# Altium PCB DSP大板子.PcbDoc (part 5 of 9)
Units mil, origin at the board's own origin, x right, y up, seen from the top; angles counter-clockwise.
Board outline 7874.02 x 9055.12 mil, 4 copper layers (Top Layer, GND02, PWR03, Bottom Layer), stack 23.756 mil thick; 656 components, 360 nets, 1967 pads, 2623 vias.
Unrouted connection lines stored in the file: 70.
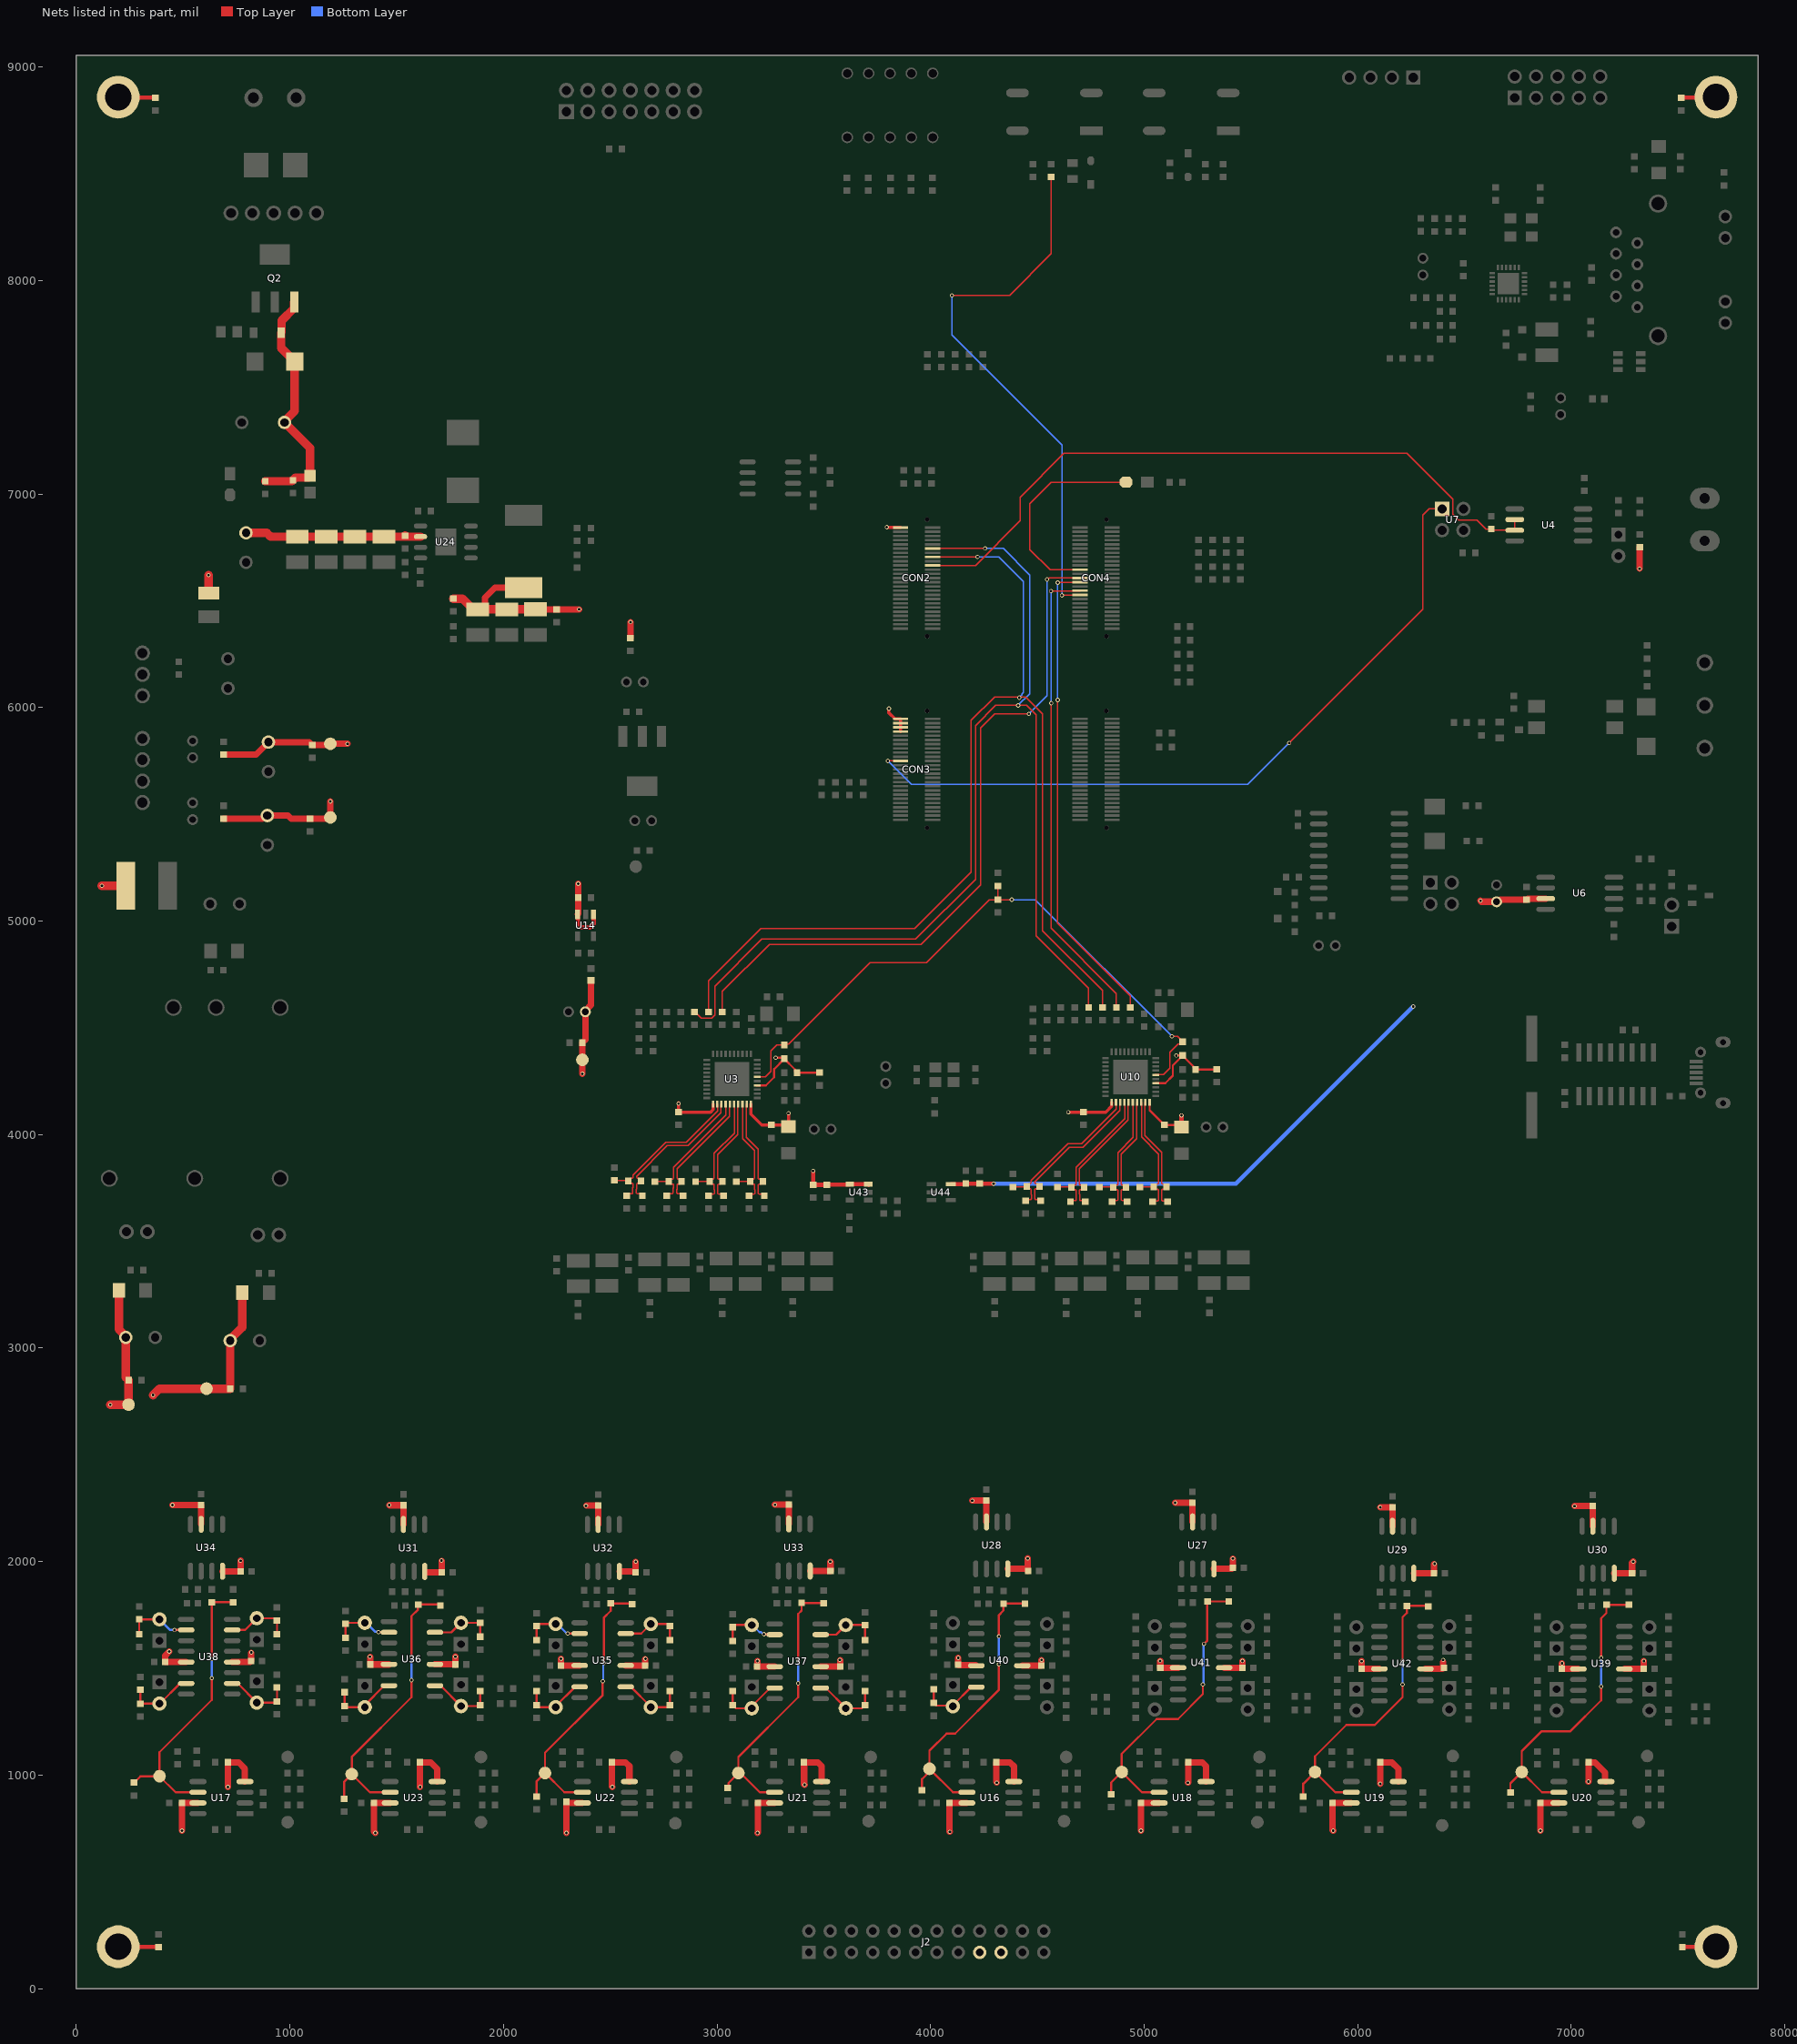
[diagram p4: the nets of this part, all layers, seen from the top]

## Part data (continued)
R18 R24 R26 R27 R28 R31 R63 R64 R66 R68: library part R_10, "贴片电阻", BOM名称=贴片电阻, 学习资源=www.ooocke.com, 版权归属=源创客
R88: library part R, "贴片电阻1%", BOM名称=贴片电阻, 封装库来自淘宝卖家 ID：黄晶宝石=其他店铺购入均为盗版，不享受售后技术支持服务，请立即申请退款, 版权归属="来自淘宝 ID：黄晶宝石", 联系售后=https://shop463601444.taobao.com
R274: library part rc0805fr-07100kl, "电阻类型:厚膜电阻;阻值:100kΩ;精度:±1%;功率:125mW;工作电压:150V;温度系数:±100ppm/℃;", JLCPCB Part Class="Extended Part", LCSC Part Name="厚膜电阻 100kΩ ±1% 125mW", Manufacturer=YAGEO(国巨), ManufacturerPart=RC0805FR-07100KL, Operating Temperature=-55℃~+155℃, Power(Watts)=125mW, Temperature Coefficient=±100ppm/℃, Tolerance=±1%, Voltage-Supply(Max)=150V, AddInBom=yes, ConvertToPcb=yes, Datasheet=https://item.szlcsc.com/datasheet/RC0805FR-07100KL/97550.html, FootprintName=R0805_NEW, ModelId=37a81e68749a4138bd2dfa6897b24b85, ModelName=R0805_L2.0-W1.3-H0.6, ModelTransform=78.74,51.181,0,0,0,0,0,-0.0005,0, Supplier=LCSC, Supplier Footprint=0805, SupplierPart=C96346, Symbol=RC0805FR-07100KL, Type=厚膜电阻
RJ1: "连接器类型:RJ45插座;安装方式:弯插;端口数量:2;LED:带LED;屏蔽:有屏蔽;触头镀层:金;工作温度:0℃~+70℃;", JLCPCB Part Class="Extended Part", LCSC Part Name="弯插 带LED", Manufacturer=belfuse, ManufacturerPart=SI-46001-F, Operating Temperature=0℃~+70℃, AddInBom=yes, Connector Type=RJ45插座, Contact Plating=金, ConvertToPcb=yes, Datasheet=https://item.szlcsc.com/datasheet/SI-46001-F/20524665.html, FootprintName=RJ45-TH_BELFUSE_SI-46001-F, LED=带LED, ModelId=7e7265f4ce6d4878958776467abf3fc9, ModelName=RJ45-TH_BELFUSE_SI-46001-F, ModelTransform=639.999,670.39236,0,0,0,0,0,-25.079,-157.48, Mounting Type=弯插, Number of Ports=2, PoE=不带PoE, Shielding=有屏蔽, Supplier=LCSC, Supplier Footprint=RJ45-TH, SupplierPart=C19267755, Symbol=SI-46001-F
SW1 SW2: library part "TSW SMD-6x6", "SW2", BOM名称=贴片6x6轻触开关, 唯一出售店铺网址=https://shop463601444.taobao.com, 版权归属="封装库来自淘宝 ID：黄晶宝石"
SW3: BOM_JLCPCB Part Class="Extended Part", BOM_Manufacturer=Dailywell, BOM_Manufacturer Part=2MS1T2B2VS2QES, BOM_Supplier=LCSC, BOM_Supplier Part=C545202, Contributor=LCSC, spicePre=S, spiceSymbolName=2MS1T2B2VS2QES
U1: "USB2UART"
U2: "输入类型:DC;正向压降(Vf):1.2V;输出电流:50mA;隔离电压(Vrms):5kV;直流反向耐压(Vr):6V;负载电压:80V;输出通道数:-;集射极饱和电压(VCE(sat)):200mV@20mA,1mA;", Current Transfer Ratio (CTR) Maximum/Saturation Value=600%, Current Transfer Ratio (CTR) Minimum=50%, Forward Current(If)=50mA, Isolation Voltage(Vrms)=5kV, JLCPCB Part Class="Extended Part", LCSC Part Name="DC输入 隔离电压(rms):5000V", Load Voltage=80V, Manufacturer=SHARP(夏普), ManufacturerPart=PC817X2CSP9F, Operating Temperature=-30℃~+100℃, Reverse Voltage=6V, Total Power Dissipation(Pd)=200mW, Voltage - Forward(Vf)=1.2V, AddInBom=yes, ConvertToPcb=yes, Datasheet=https://item.szlcsc.com/datasheet/PC817X2CSP9F/67489.html, Fall time=3us, FootprintName=SMD-4_L4.6-W6.5-P2.54-LS10.2-TL, Input type=DC, ModelId=991879f0d3e24dbd9895164815fb95aa, ModelName=SMD-4_L4.6-W6.5-H3.7-LS10.2-P2.54, ModelTransform=401.94494,181.102,0,0,0,0,0,0.003,0, Number of Outputs=-, Output Current=50mA, Output Type=光电三极管, Rise time=4us, Supplier=LCSC, Supplier Footprint=SMD-4P, SupplierPart=C66405, Symbol=PC817X2CSP9F, Vce Saturation(VCE(sat))=200mV@20mA,1mA
U3 U10: "分辨率:24;工作电压:3.3V~3.6V;接口类型:I2C；SPI;", JLCPCB Part Class="Extended Part", LCSC Part Name=四通道模数转换器(ADC), Manufacturer=ADI(亚德诺), ManufacturerPart=ADAU1979WBCPZ-RL, Operating Temperature=-40℃~+105℃, Voltage - Supply=3.3V~3.6V, AddInBom=yes, ConvertToPcb=yes, Datasheet=https://item.szlcsc.com/datasheet/ADAU1979WBCPZ-RL/209011.html, FootprintName=QFN-40_L6.0-W6.0-P0.50-TL-EP4.1, Interface Type=I2C；SPI, ModelId=7c9bc19ca4c64354924a13059f0c15c7, ModelName=QFN-40_L6.0-W6.0-P0.50-TL-EP4.1, ModelTransform=237.007,237.007,0,0,0,0,0,0,0, Number of Channels=4, Resolution=24, Supplier=LCSC, Supplier Footprint=LFCSP-40(6x6), SupplierPart=C207957, Symbol=ADAU1979WBCPZ-RL
U4: library part TJA1057GT3, CLASS=IC
U5: "接口类型:I2C;存储容量:64Kbit;时钟频率(fc):1MHz;", Clock Frequency=1MHz, JLCPCB Part Class="Extended Part", LCSC Part Name="64 Kbit串行I2C总线EEPROM", Manufacturer=ST(意法半导体), ManufacturerPart=M24C64-RMN6TP, Operating Temperature=-40℃~+85℃, Voltage - Supply=1.8V~5.5V, AddInBom=yes, ConvertToPcb=yes, Data Retention - TDR (Year)=200年, Datasheet=https://item.szlcsc.com/datasheet/M24C64-RMN6TP/81133.html, Features=内置上电复位(POR)；硬件写保护功能；内置错误纠正码(ECC)功能, FootprintName=SOIC-8_L5.0-W4.0-P1.27-LS6.0-BL, Interface=I2C, Memory Size=64Kbit, ModelId=7abc64c95a1a4a04a4ef38f9097c870b, ModelName=SOIC-8_L5.0-W4.0-P1.27-LS6.0-BL, ModelTransform=192.913,236.22,0,0,0,0,0,0,0, Supplier=LCSC, Supplier Footprint=SOIC-8, SupplierPart=C79988, Symbol=M24C64-RMN6TP, Write Cycle Endurance=400万次, Write Cycle Time(Tw)=5ms
U7 U11: "插针结构:2x2P;间距:2.54mm;行距:2.54mm;圆针/方针:方针;安装方式:直插;排数:双排;总PIN位数:4P;额定电流:3A;塑高:2.54mm;触头材质:黄铜;触头镀层:金;工作温度:-40℃~+105℃;颜色:黑色;", Color=黑色, Current Rating=3A, JLCPCB Part Class="Extended Part", LCSC Part Name="2x2P 间距:2.54mm 方针 直插", Manufacturer=GREENCONN(格康), ManufacturerPart=GPHA201-0202A001A1BA, Operating Temperature=-40℃~+105℃, AddInBom=yes, Circluar Pins/Square Pins=方针, Contact Material=黄铜, Contact Plating=金, ConvertToPcb=yes, Datasheet=https://item.szlcsc.com/datasheet/GPHA201-0202A001A1BA/8446427.html, FootprintName=HDR-TH_4P-P2.54-V-M-R2-C2-S2.54, Insulation Height=2.54mm, ModelId=396726ecc332483f84428c142640bc15, ModelName=HDR-TH_4P-P2.54-M-LI-2X2P, ModelTransform=200.03897,196.85,0,0,0,0,0,0,-118.11, Mounting Type=直插, Number of Pins=4P, Number of Rows=双排, Pin Structure=2x2P, Pitch=2.54mm, Row Spacing=2.54mm, Supplier=LCSC, Supplier Footprint=插件,P=2.54mm, SupplierPart=C7434503, Symbol=GPHA201-0202A001A1BA
U8: "插针结构:1x2P;间距:2.54mm;行距:-;圆针/方针:方针;安装方式:直插;排数:单排;总PIN位数:2P;额定电流:3A;额定电压:1kV;配合针长度:6mm;塑高:2.5mm;端接针长度:3mm;触头材质:黄铜;触头镀层:金;工作温度:-40℃~+105℃;颜色:黑色;", Color=黑色, Current Rating=3A, JLCPCB Part Class="Extended Part", LCSC Part Name="1x2P 间距:2.54mm 方针 直插", Manufacturer=hanxia(韩下), ManufacturerPart="HX PZ2.54-1x2P ZZ", Operating Temperature=-40℃~+105℃, Voltage Rating (Max)=1kV, AddInBom=yes, Circluar Pins/Square Pins=方针, Contact Material=黄铜, Contact Plating=金, ConvertToPcb=yes, Datasheet=https://item.szlcsc.com/datasheet/HX%2520PZ2.54-1x2P%2520ZZ/34444548.html, FootprintName=HDR-TH_2P-P2.54-V-M-3, Insulation Height=2.5mm, Length of End Connection Pin=3mm, Length of Mating Pin=6mm, ModelId=c7a9f3c3e6e34627af2bf939e464cb35, ModelName=HDR-TH_2P-P2.54-M-LI-1X2P, ModelTransform=200,100,0,0,0,0,0,0,-118.11, Mounting Type=直插, Number of Pins=2P, Number of Rows=单排, Pin Structure=1x2P, Pitch=2.54mm, Row Spacing=-, Supplementary Features=-, Supplier=LCSC, Supplier Footprint=插件,P=2.54mm, SupplierPart=C32713268, Symbol="HX PZ2.54-1X2P ZZ"
U9: "MCP2515是一款独立的CAN控制器，支持CAN V2.0B协议，数据传输速率为1 Mbps。它通过SPI接口与MCU通信。", Current - Supply=5mA, JLCPCB Part Class="Extended Part", LCSC Part Name=独立CAN控制器带SPI接口, Manufacturer=MICROCHIP(美国微芯), ManufacturerPart=MCP2515T-I/SO, Operating Temperature=-40℃~+85℃, Quiescent Supply Current=1uA, Voltage - Supply=2.7V~5.5V, AddInBom=yes, ConvertToPcb=yes, Data Rate=1Mbps, Datasheet=https://item.szlcsc.com/datasheet/MCP2515T-I%252FSO/165124.html, Features=可编程位时序；单次发送模式；低功耗模式, FootprintName=SOIC-18_L11.6-W7.5-P1.27-LS10.3-BL, ModelId=591e416e62784c3bb8a96e1097595c87, ModelName=SOIC-18_L11.6-W7.5-H2.7-LS10.3-P1.27, ModelTransform=456.692,409.68154,0,0,0,0,0,0,0, Protocol=SPI, Supplier=LCSC, Supplier Footprint=SOIC-18-300mil, SupplierPart=C153782, Symbol=MCP2515T-I/SO, Type=CAN控制器
U12: "类型:PHY收发器;端口数量:1;MAC接口:RMII;", JLCPCB Part Class="Extended Part", LCSC Part Name="KSZ8081RNA/RND 10BASE-T/100BASE-TX PHY 收发器", Manufacturer=MICROCHIP(美国微芯), ManufacturerPart=KSZ8081RNACA-TR, Operating Temperature=0℃~+70℃, Voltage - Supply=3.3V, AddInBom=yes, ConvertToPcb=yes, Data Rate=10Mbit/s；100Mbit/s, Datasheet=https://item.szlcsc.com/datasheet/KSZ8081RNACA-TR/101231.html, Ethernet Speed Standards=10BASE-T；100BASE-TX, Features=错误检测与恢复；低功耗模式；可编程LED指示；电缆诊断, FootprintName=QFN-24_L4.0-W4.0-P0.50-BL-EP2.6, MAC Interface=RMII, ModelId=1e6a51e223ba431598528b34e5bdfcc9, ModelName=QFN-24_L4.0-W4.0-H0.9-P0.50, ModelTransform=157.48,157.48,0,90,0,0,0,0,0, Number of Ports=1, Supplier=LCSC, Supplier Footprint=QFN-24-EP(4x4), SupplierPart=C100017, Symbol=KSZ8081RNACA-TR, Type=PHY收发器
U13: "插针结构:1x4P;间距:2.54mm;行距:2.54mm;圆针/方针:方针;安装方式:直插;排数:单排;总PIN位数:4P;额定电流:3A;塑高:2.54mm;触头材质:黄铜;触头镀层:金;工作温度:-40℃~+105℃;颜色:黑色;", Color=黑色, Current Rating=3A, JLCPCB Part Class="Extended Part", LCSC Part Name="1x4P 间距:2.54mm 方针 直插", Manufacturer=GREENCONN(格康), ManufacturerPart=GPHA101-0402A001A1BA, Operating Temperature=-40℃~+105℃, AddInBom=yes, Circluar Pins/Square Pins=方针, Contact Material=黄铜, Contact Plating=金, ConvertToPcb=yes, Datasheet=https://item.szlcsc.com/datasheet/GPHA101-0402A001A1BA/8446402.html, FootprintName=HDR-TH_4P-P2.54-V-M, Insulation Height=2.54mm, ModelId=112f4d05e8d64e99ab9a333894bea4f9, ModelName=HDR-TH_4P-P2.54-M-LI-1X4P, ModelTransform=399.999,104.7242,0,0,0,0,0,0,-118.11, Mounting Type=直插, Number of Pins=4P, Number of Rows=单排, Pin Structure=1x4P, Pitch=2.54mm, Row Spacing=2.54mm, Supplier=LCSC, Supplier Footprint=插件,P=2.54mm, SupplierPart=C7434478, Symbol=GPHA101-0402A001A1BA
U14: "输出极性:正极;工作电压:5.5V;输出电压:3.3V;输出电流:250mA;电源纹波抑制比(PSRR):82dB@(1kHz);输出类型:固定;", JLCPCB Part Class="Extended Part", LCSC Part Name="3.3V 250mA 5.5V", Manufacturer=TI(德州仪器), ManufacturerPart=LP5907MFX-3.3/NOPB, Operating Temperature=-40℃~+125℃@(Tj), Output Current=250mA, Output Voltage=3.3V, Power Supply Rejection Ratio (PSRR)=82dB@(1kHz), standby current=12uA, Voltage - Supply=5.5V, Voltage Dropout=250mV@(250mA), AddInBom=yes, ConvertToPcb=yes, Datasheet=https://www.ti.com/cn/lit/ds/symlink/lp5907.pdf, Features=热关断；使能控制；输出放电；短路保护；输入欠压保护, FootprintName=SOT-23-5_L3.0-W1.7-P0.95-LS2.8-BR, ModelId=0a2a1b8f50944f73965918ad6e5fe167, ModelName=SOT-23-5_L2.9-W1.6-H1.1-LS2.8-P0.95, ModelTransform=114.173,109.636,0,180,0,0,0,0,0, Noise=10uVrms, Number of Outputs=1, Output Configuration=正极, Output Type=固定, Supplier=LCSC, Supplier Footprint=SOT-23-5, SupplierPart=C80670, Symbol=LP5907MFX-3.3/NOPB
U15: Dropout Voltage=1.3V@(800mA), JLCPCB Part Class="Basic Part", LCSC Part Name="输出3.3V 1A", Manufacturer=AMS, Manufacturer Part=AMS1117-3.3, MAX Output Current=1A, Maximum Input Voltage=-, Output Voltage=3.3V, Power Supply Rejection Ratio (PSRR)=72dB@(120Hz), Add into BOM=yes, Convert to PCB=yes, Datasheet=https://atta.szlcsc.com/upload/public/pdf/source/20180727/C6186_7A095716F0823C02F1997A905E26C086.pdf, Device=AMS1117-3.3_C6186, Feature=-, Noise=-, Number of Outputs=1, Operating Temperature=-, Output Polarity=正极, Output Type=固定, standby current=-, Supplier=LCSC, Supplier Footprint=SOT-223-3, Supplier Part=C6186, Symbol=AMS1117-3.3
U16 U17 U18 U19 U20 U21 U22 U23: library part AD620BR, "CI-AD620BR"
U24: "功能类型:降压型;工作电压:4.5V~60V;输出电压:800mV~58.8V;输出电流:5A;输出类型:可调;", Frequency - Switching=500kHz, JLCPCB Part Class="Extended Part", LCSC Part Name="降压型 5A 4.5V~60V", Manufacturer=TI(德州仪器), ManufacturerPart=TPS54560BDDAR, Operating Temperature=-40℃~+150℃@(TJ), Output Current=5A, Output Voltage=800mV~58.8V, Quiescent Current=146uA, Voltage - Supply=4.5V~60V, AddInBom=yes, ConvertToPcb=yes, Datasheet=https://www.ti.com/cn/lit/gpn/tps54560b, Features=轻载高效模式；逐波限流；频率同步；过流保护, FootprintName=POWERPAD-SO-8_L4.9-W3.9-P1.27-LS6.0-BL-EP, Function=降压型, ModelId=3be500d54979453db96888fa439d0a60, ModelName=POWERPAD-SO-8_L4.9-W3.9-P1.27-LS6.0-BL-EP, ModelTransform=192.913,236.22,0,0,0,0,0,0,0, Number of Outputs=1, Output Type=可调, Supplier=LCSC, Supplier Footprint=SO-8, SupplierPart=C1850354, Switch tube (built-in/external)=内置, Symbol=TPS54560BDDAR, Synchronous Rectifier=否, Topology=降压式
U25: library part ura2412s-6wr3_c2757452, "特性：超宽4:1输入电压范围。 高效率达85%。 空载功耗低至0.24W。 I/O隔离测试电压1.5kV DC。 输入欠压保护，输出短路、过流保护。 工作环境温度范围：-40℃至+85℃。应用：医疗保健。 工业控制", Capacitive Load(Max)=120uF, Isolation Voltage(Vrms)=1.5kV, JLCPCB Part Class="Extended Part", LCSC Part Name="9V~36V ±12V 250mA 6W", Manufacturer=MORNSUN(金升阳), Operating Temperature=-40℃~+85℃, Output Current(Max)=250mA, Output Power=6W, Output Voltage=±12V, Quiescent Supply Current=-, Voltage - Supply=9V~36V, AddInBom=yes, Conversion Efficiency=83%, ConvertToPcb=yes, Datasheet=https://item.szlcsc.com/datasheet/URA2412S-6WR3/2873721.html, Features=欠压保护；短路保护；过流保护；轻载高效模式, FootprintName=PWRM-TH_URAXXXXS-6WR3, Height=12mm, Length=22mm, ManufacturerPart=URA2412S-6WR3, ModelId=59ee18447e164eb5803ce5c0826121e9, ModelName=PWRM-TH_URAXXXXS-6WR3, ModelTransform=866.14,374.015,0,0,0,0,0,-81.299,-161.417, Number of Outputs=2, Ripple Noise=120mVp-p, Supplier=LCSC, Supplier Footprint=SIP,22x9.5mm, SupplierPart=C2757452, Symbol=URA2412S-6WR3_C2757452, Type=-, Voltage Regulation=-, Width=9.5mm
U26: "特性：超宽4:1输入电压范围。高效率达90%。空载功耗低至0.24W。I/O隔离测试电压1.5kV DC。输入欠压保护、输出短路、过流、过压保护。工作环境温度范围：-40℃至+105℃。应用：工业控制。电力", JLCPCB Part Class="Extended Part", LCSC Part Name="15W 隔离式 DC-DC 转换器", Manufacturer=MORNSUN(金升阳), ManufacturerPart=URA2415YMD-15WR3, AddInBom=yes, ConvertToPcb=yes, Datasheet=https://item.szlcsc.com/datasheet/URA2415YMD-15WR3/5842586.html, FootprintName=PWRM-TH_URA2415YMD-15WR3, Supplier=LCSC, Supplier Footprint=DIP,25.4x25.4mm, SupplierPart=C5182197, Symbol=URA2415YMD-15WR3_C5182197
U27 U28 U29 U30 U31 U32 U33 U34: "LT1793CS8#PBF", AddInBom=yes, DesignItemID=LT1793, Device=LT1793, FootprintName=SOP-8, LibraryName="1.6 - ADI系列精密运放", OriginModelName="User Library-so-8", SymbolName=LT1793
  U27: UniqueId=b94fd32bcc95872d
  U28: UniqueId=2c27b242a2875aaf
  U29: UniqueId=be87043ebfc5f98d
  U30: UniqueId=03a1f9b1f2129ca8
  U31: UniqueId=4ec783ed4741de1f
  U32: UniqueId=484e3008dca2bfa8
  U33: UniqueId=2dbbb3175ebf36d7
  U34: UniqueId=124c013cfc851acc
U35 U36 U37 U38 U39 U40 U41 U42: library part DG201BDY-T1E3, AddInBom=yes, DesignItemID=DG201BDY-T1E3, Device=DG201BDY-T1E3, FootprintName=dg201BDY, LibraryName="4.1 - 未分类器件", SymbolName=DG201BDY-T1E3
  U35: UniqueId=6151f2f354ad58a1
  U36: UniqueId=ea6c5e45b64ed132
  U37: UniqueId=6e245fde712204fc
  U38: UniqueId=4bb3335060f18692
  U39: UniqueId=ca4d2b64b6ec8380
  U40: UniqueId=1bdc0ab44f99f92d
  U41: UniqueId=c69de7c088414df5
  U42: UniqueId=28995c53ef78d865
U43: "输出类型:固定;工作电压:3.02V~5.5V;输出电压:3V;输出电流:20mA;精度:±0.05%;", JLCPCB Part Class="Extended Part", LCSC Part Name="3.02V~5.5V 串联 460uA 8ppm/℃", Manufacturer=TI(德州仪器), ManufacturerPart=REF2030AIDDCR, Minimum Cathode Current for Regulation=-, Operating Temperature=-40℃~+125℃, Output Current=20mA, Output Voltage=3V, Quiescent Current=460uA, Temperature Coefficient=8ppm/℃, Tolerance=±0.05%, Voltage - Supply=3.02V~5.5V, AddInBom=yes, ConvertToPcb=yes, Datasheet=https://www.ti.com/cn/lit/ds/symlink/ref2030.pdf, Features=使能/关断；内置输出缓冲；多路参考输出, FootprintName=SOT-23-5_L2.9-W1.6-P0.95-LS2.8-BL, ModelId=018c57e721114987ae90467fe9f1d259, ModelName=SOT-23-5_L2.9-W1.6-P0.95-LS2.8-BL, ModelTransform=114.96,110.236,0,0,0,0,0,0,0, Noise - 1/10Hz to 10Hz=12ppmp-p, Noise - 10Hz to 10kHz=-, Output Type=固定, Reference Type=串联, Supplier=LCSC, Supplier Footprint=SOT-23-5, SupplierPart=C528704, Symbol=REF2030AIDDCR
U44: "放大器数:单路;增益带宽积(GBP):10MHz;输入偏置电流(Ib):5pA;输入失调电压(Vos):5uV;压摆率(SR):20V/us;轨到轨:轨到轨输入,轨到轨输出;", Ib - Input Bias Current=5pA, Input Offset Current(Ios)=2pA, Input Offset Voltage Drift(Vos TC)=200nV/℃, JLCPCB Part Class="Extended Part", LCSC Part Name=36V低失调电压、低输入偏置电流、轨到轨输入/输出精密运算放大器，具有e-trim特性, Manufacturer=TI(德州仪器), ManufacturerPart=OPA192IDBVR, Maximum Power Supply Range (Vdd-Vss)=36V, Operating Temperature=-40℃~+125℃, Output Current=65mA, Quiescent Current(Iq)=1mA, Vos - Input Offset Voltage=5uV, AddInBom=yes, Common Mode Rejection Ratio(CMRR)=140dB, ConvertToPcb=yes, Datasheet=https://www.ti.com/cn/lit/gpn/opa192, Dual Supply=-18V~-2.25V；2.25V~18V, FootprintName=SOT-23-5_L3.0-W1.7-P0.95-LS2.8-BL, Gain Bandwidth Product=10MHz, ModelId=0a2a1b8f50944f73965918ad6e5fe167, ModelName=SOT-23-5_L2.9-W1.6-H1.1-LS2.8-P0.95, ModelTransform=118.60433,114.173,0,90,0,0,0.0005,0.0005,0, Noise density(eN)=5.5nV/√Hz@1kHz, Number of Channels=单路, Rail to Rail=轨到轨输入,轨到轨输出, Single Supply=4.5V~36V, Slew Rate=20V/us, Supplier=LCSC, Supplier Footprint=SOT-23-5, SupplierPart=C139648, Symbol=OPA192IDBVR
USB1: Current Rating - Power (Max)=1A, JLCPCB Part Class="Extended Part", LCSC Part Name="Micro-B 母 卧贴", Manufacturer="SHOU HAN(首韩)", Operating Temperature Range=-20℃~+85℃, Add into BOM=yes, Connector Type=Micro-B, Convert to PCB=yes, Datasheet=https://atta.szlcsc.com/upload/public/pdf/source/20220415/2494EDFF499AF6F852F7C820374B6AF3.pdf, Device=MicroXNJ, Gender=母, Manufacturer Part=MicroXNJ, Mounting Style=卧贴, Number of Contacts=5P, Number of Ports=1, Standard="USB 2.0", Supplier=LCSC, Supplier Footprint=SMD, Supplier Part=C404969, Symbol=MICROXNJ
X1: library part 12MHz, BOM_JLCPCB Part Class="Extended Part", BOM_Manufacturer="Yangxing Tech", BOM_Manufacturer Part=X49SM12MSB2SC, BOM_Supplier=LCSC, BOM_Supplier Part=C110563, Contributor=LCSC, nameAlias=Frequency, spicePre=X, spiceSymbolName=X49SM12MSB2SC
X2: "晶振类型:贴片晶振;频率:16MHz;常温频差:±10ppm;负载电容:20pF;频率稳定度:±20ppm;", Equivalent Series Resistance(ESR)=80Ω, Frequency Stability=±20ppm, JLCPCB Part Class="Extended Part", LCSC Part Name="YSX530GA 16MHZ 2P 5032 20PF ±10PPM -40~85℃ (±20PPM)", Load Capacitance=20pF, Manufacturer=YXC(扬兴晶振), ManufacturerPart=X503216MSB2GI, Normal temperature Frequency Tolerance=±10ppm, Operating Temperature=-40℃~+85℃, AddInBom=yes, ConvertToPcb=yes, Datasheet=https://item.szlcsc.com/datasheet/X503216MSB2GI/113805.html, FootprintName=OSC-SMD_L5.0-W3.2, ModelId=36c8b961b9064b60a7c920ab5154e867, ModelName=OSC-SMD_L5.0-W3.2-H1.4, ModelTransform=196.85,126.023,0,0,0,0,0,0,0, Supplier=LCSC, Supplier Footprint=SMD5032-2P, SupplierPart=C112572, Symbol=X503216MSB2GI, Type=贴片晶振
Y1: library part CRYSTAL_4P, CLASS=IC
Z1 Z2: library part "DIODE BI-DIR TRIG"
U6: CLASS=IC

## Free pads (board coordinates)
  round 200 hole 125: 1(196.85,196.85) 2(7677.17,196.85) 3(7677.17,8858.27) 4(196.85,8858.27)

## Via types
v1: diameter 20, hole 12, Top Layer to Bottom Layer, tented both sides, 2623 vias

## Nets (pads, with @x,y where several pads share a name; then routed paths per layer and width w, separated by ;. In a path a pad name is that pad's centre, name@x,y a point inside that pad or via, vN(x,y) a via of type N, cw(c..) or ccw(c..) an arc to the next point about the centre after c; other vN are vias at no path point)
1: pad.1 R300.1 | length 188.9
  Top Layer w20: pad.1@196.85,196.85 197.74,195.96 384.11,195.96 R300.1@385,195.08
2: pad.2 R301.1 | length 157.9
  Top Layer w20: R301.1@7520,195.08 7520.89,195.96 7676.28,195.96 pad.2@7677.17,196.85
3: pad.3 R302.1 | length 163.6
  Top Layer w20: R302.1@7515,8854.92 7516.67,8856.59 7675.49,8856.59 pad.3@7677.17,8858.27
4: pad.4 R303.1 | length 174.5
  Top Layer w20: pad.4@196.85,8858.27 198.52,8856.59 368.33,8856.59 R303.1@370,8854.92
485DE: CON2.31 R51.2 U4.2 U4.3 | length 3247.8
  Top Layer w6: CON2.31@4009.44,6665.46 4009.91,6665 4210,6665 4420,6875 4420,6985 4625,7190 6230,7190 6445,6975 6445,6905 6472.49,6877.51 6557.49,6877.51 6599.92,6835.08 R51.2@6625,6835.08 6630.08,6830 U4.3@6735,6830 U4.2@6735,6880
+5V_SYS: C22.1 C27.1 C78.2 C109.2 C110.2 C111.2 C114.1 C115.1 C116.1 CON2.50 CON3.44 CON3.46 CON3.48 CON3.50 L3.2 R34.2 R126.1 R131.2 U6.3 U14.1 U14.3 U44.5 | length 4416.9
  Top Layer w15: v1(3795,6845) 3797.44,6842.56 CON2.50@3859.84,6842.56 ; v1(3805,5995) 3805,5974.99 3833.49,5946.5 CON3.50@3859.84,5946.5 CON3.48@3859.84,5926.8 CON3.46@3859.84,5907.2 CON3.44@3859.84,5887.5
  Top Layer w20: U14.3@2347.6,5031.2 2349.4,5029.4 2349.4,4985.6 2365,4970 2405,4970 2422.4,4987.4 U14.1@2422.4,5031.2 ; U44.5@4095.42,3767.4 C111.2@4162.6,3767.4 ; C111.2@4165,3770.08 C109.2@4230,3770.08 4294.92,3770.08 v1(4295,3770)
  Top Layer w30: C114.1@1880,6459.5 1897.04,6459.5 1914.24,6476.7 1914.24,6514.24 1960.71,6560.71 L3.2@2095,6560.71 ; C116.1@2149.85,6459.85 C116.1@2150,6460 C110.2@2250,6460 v1(2355,6460) ; U14.3@2347.6,5031.2 2350.04,5033.64 2350.04,5109.96 C78.2@2350.08,5110 2350.08,5174.92 v1(2350,5175) ; R126.1@2595,6325 v1(2595,6400) ; v1(6575,5095) 6579.41,5090.59 6649.41,5090.59 C22.1@6650,5090 6655.73,5090 6665.73,5100 C27.1@6790,5100 ; C27.1@6790.71,5100 6795.71,5105 U6.3@6880,5105 ; v1(7320,6650) R34.2@7320,6750.16
  Top Layer w40: R131.2@1765,6509.84 1808.71,6509.84 1859.05,6459.5 C114.1@1880,6459.5 1880.1,6459.6 2014.9,6459.6 C115.1@2015,6459.7 2015.15,6459.85 C116.1@2149.85,6459.85
  Bottom Layer w20: v1(4295,3770) 5430,3770 v1(6260,4600)
+12V: +12.1 C142.1 C143.1 C158.2 C160.2 C162.2 C164.2 C166.2 C168.2 C170.2 C173.2 C181.2 C183.2 C185.2 C187.2 C189.2 C191.2 C193.2 C195.2 R195.1 U27.7 U28.7 U29.7 U30.7 U31.7 U32.7 U33.7 U34.7 U35.13 U36.13 U37.13 U38.13 U39.13 U40.13 U41.13 U42.13 | length 2929.5
  Top Layer w10: v1(1375.23,1555) v1@1376.23,1554 ; U36.13@1463.8,1518.63 U36.13@1464.23,1519.07 U36.13@1465.16,1520 ; v1(1465,2265) v1@1465.93,2264.07 ; v1(2270,1545) v1(2270,1545) ; v1(2386.43,2261.43) v1@2387.87,2262.87 ; C187.2@3187.9,1508.17 C187.2@3190,1510.27 ; v1@3270,2265 v1(3271.41,2266.41) ; C189.2@4129.76,1517.85 C189.2@4131.61,1516 ; v1(4129.76,1549.76) v1@4130,1550 ; v1@4195,2285 v1(4195.49,2285.49) ; U40.13@4211.03,1516 U40.13@4214.18,1512.85 ; v1(5075,1535) v1@5075.67,1534.33 ; v1@5145,2275 v1(5145.49,2275.49)
  Top Layer w30: v1(435.48,1579.31) 435.48,1578.85 415.6,1558.97 C183.2@415.6,1530 U38.13@515,1530 ; v1(450,2265) 450.52,2264.48 C173.2@585,2264.48 U34.7@585,2175.08 ; R195.1@690,5780.08 842.28,5780.08 C142.1@900,5837.8 1091.41,5837.8 1104.29,5824.92 C143.1@1105,5824.92 1105.04,5824.96 1184.96,5824.96 +12.1@1190,5830 v1(1270,5830) ; v1@1376.23,1554 C185.2@1376.23,1518.63 U36.13@1463.8,1518.63 ; v1@1465.93,2264.07 C166.2@1531.93,2264.07 U31.7@1531.93,2174.07 ; v1(2270,1545) C181.2@2269.95,1513.53 U35.13@2357.25,1513.53 ; v1@2387.87,2262.87 C168.2@2443.44,2262.87 U32.7@2443.44,2174.07 ; C187.2@3187.9,1508.17 U37.13@3270.2,1508.17 ; C187.2@3190,1510.27 v1(3190,1535) ; v1(3271.41,2266.41) C170.2@3336.39,2266.41 U33.7@3336.39,2176.41 ; C189.2@4129.76,1517.85 v1(4129.76,1549.76) ; C189.2@4131.61,1516 U40.13@4211.03,1516 ; v1(4195.49,2285.49) C160.2@4261.62,2285.49 U28.7@4261.62,2186.09 ; v1@5075.67,1534.33 C195.2@5075.67,1502.85 U41.13@5158.85,1502.85 ; v1(5145.49,2275.49) C158.2@5226.48,2275.49 U27.7@5226.48,2186.09 ; v1(6018.53,1533.53) C193.2@6018.53,1497.7 U42.13@6101.61,1497.7 ; v1(6105,2255) C162.2@6162.82,2255.02 U29.7@6162.82,2165.62 ; v1(6956.2,1523.8) C191.2@6956.2,1497.62 U39.13@7032.98,1497.62 ; v1(7015,2260) C164.2@7100.61,2260.02 U30.7@7100.61,2165.62
+15V: +15.1 C92.1 C96.1 C97.1 C98.1 C99.1 C100.1 C101.1 C107.1 C120.1 C154.2 J2.17 L7.2 U16.7 U17.7 U18.7 U19.7 U20.7 U21.7 U22.7 U23.7 | length 2364.5
  Top Layer w30: v1(495,740) 494.92,740.08 C96.1@494.92,870 U17.7@570,870 ; v1(1400,730) 1394.92,735.08 C107.1@1394.92,870 U23.7@1470,870 ; C100.1@2294.18,875 2294.18,730.82 v1(2295,730) ; C100.1@2298.48,870 U22.7@2370,870 ; v1(3190,730) 3191.32,731.32 C101.1@3191.32,870 U21.7@3270,870 ; v1(4090,735) 4088.45,736.55 C92.1@4088.45,870 U16.7@4170,870 ; v1(4985,740) 4985.58,740.58 C97.1@4985.58,870 U18.7@5070,870 ; v1(5885,740) 5882.71,742.29 C98.1@5882.71,870 U19.7@5970,870 ; v1(6855,740) 6854.84,740.16 C99.1@6854.84,870 U20.7@6941.91,870
  Top Layer w40: v1(160,2735) +15.1@245,2735 245.08,2735.08 C154.2@245.08,2850 ; L7.2@199.6,3270 199.6,3088.83 232.2,3056.23 C120.1@232.2,3050 232.2,2862.8 C154.2@245.04,2849.96
+24V_SYS: C102.1 C103.1 C104.1 C105.1 C106.1 C178.1 C179.2 C180.1 D7.1 D8.1 L4.1 L6.1 Q2.3 R127.2 R273.1 U24.2 | length 2184
  Top Layer w40: v1(120,5165) L6.1@231.57,5165 ; L4.1@620,6535.12 v1(620,6620) ; C102.1@795,6817.8 892.49,6817.8 910.59,6799.7 C103.1@1035,6799.7 C104.1@1170,6799.7 C105.1@1305,6799.7 C106.1@1440,6799.7 1534.78,6799.7 R127.2@1540,6804.92 1544.92,6800 U24.2@1611.89,6800 ; R273.1@885,7059.84 1009.92,7059.84 1026.69,7076.61 1088.43,7076.61 C179.2@1095,7083.19 ; Q2.3@1020.55,7898.39 1020.55,7870.48 961.46,7811.39 961.46,7757.09 D7.1@959.37,7755 959.37,7683.57 999.78,7643.16 1002.64,7643.16 1022.94,7622.85 D8.1@1022.94,7620 1022.94,7389.16 975,7341.22 C178.1@975,7335 1095,7215 C179.2@1095,7083.19 ; C179.2@1095,7084.37 C179.2@1095,7083.19
-12V: -12.1 C144.2 C145.1 C159.2 C161.2 C163.2 C165.2 C167.2 C169.2 C171.2 C174.2 C182.2 C184.2 C186.2 C188.2 C190.2 C192.2 C194.2 C196.2 R200.1 U27.4 U28.4 U29.4 U30.4 U31.4 U32.4 U33.4 U34.4 U35.4 U36.4 U37.4 U38.4 U39.4 U40.4 U41.4 U42.4 | length 2694.2
  Top Layer w10: v1(769.4,2004.4) v1@770,2005 ; C184.2@813.8,1530 C184.2@818.8,1535 ; v1@818.8,1573.8 v1(820,1575) ; U31.4@1631.93,1954.07 1631.93,1952.07 U31.4@1634.93,1949.07 ; v1(1710,2005) v1@1711.33,2003.67 ; C186.2@1774.59,1519.07 C186.2@1775.03,1518.63 ; C169.2@2612.84,1954.07 C169.2@2617.84,1949.07 ; v1@2617.84,1997.84 v1(2620,2000) ; v1@2663.75,1543.75 v1(2665,1545) ; v1(3530,2000) v1@3531.39,1998.61 ; v1(3575,1540) v1@3577.3,1537.7 ; C161.2@4446.02,1966.09 C161.2@4456.02,1956.09 C161.2@4455,1957.11 ; v1@4519.16,1539.16 v1(4520,1540) ; C159.2@5410.88,1966.09 C159.2@5415.88,1971.09 ; v1(5415,2015) v1@5415.88,2014.12 ; v1@5459.47,1534.47 v1(5460,1535) ; v1@6357.22,1987.22 v1(6360,1990) ; C194.2@6397.93,1497.7 C194.2@6402.93,1502.7 C194.2@6400,1505.62 ; v1@7339.4,1534.4 v1(7340,1535)
  Top Layer w30: U34.4@685,1955.08 C174.2@769.4,1955.08 v1(769.4,2004.4) ; R200.1@690,5480.16 872.33,5480.16 886.07,5493.9 C144.2@895,5493.9 992.06,5493.9 1006.12,5479.84 C145.1@1095,5479.84 1095.04,5479.88 1184.88,5479.88 -12.1@1190,5485 v1(1190,5560) ; U38.4@730.4,1530 C184.2@813.8,1530 ; C184.2@818.8,1535 v1@818.8,1573.8 ; U31.4@1634.93,1949.07 C167.2@1711.33,1949.07 v1@1711.33,2003.67 ; U36.4@1679.63,1519.07 C186.2@1774.59,1519.07 ; C186.2@1775,1518.66 v1(1775,1555) ; U32.4@2543.44,1954.07 C169.2@2612.84,1954.07 ; U35.4@2572.65,1513.53 C182.2@2663.75,1513.53 v1@2663.75,1543.75 ; C169.2@2617.84,1949.07 v1@2617.84,1997.84 ; U33.4@3436.39,1956.41 C171.2@3531.39,1956.41 v1@3531.39,1998.61 ; U37.4@3485.6,1508.17 C188.2@3577.3,1508.17 v1@3577.3,1537.7 ; U28.4@4361.62,1966.09 C161.2@4446.02,1966.09 ; U40.4@4429.58,1512.85 C190.2@4519.16,1512.85 v1@4519.16,1539.16 ; C161.2@4455,1957.11 v1(4455,2015) ; U27.4@5326.48,1966.09 C159.2@5410.88,1966.09 ; U41.4@5374.25,1502.85 C196.2@5459.47,1502.85 v1@5459.47,1534.47 ; C159.2@5415.88,1971.09 v1@5415.88,2014.12 ; U29.4@6262.82,1945.62 C163.2@6357.22,1945.62 v1@6357.22,1987.22 ; U42.4@6317.01,1497.7 C194.2@6397.93,1497.7 ; C194.2@6400,1505.62 6400,1530 ; U30.4@7200.61,1945.62 C165.2@7284.41,1945.62 7284.41,1994.41 v1(7290,2000) ; U39.4@7248.38,1497.62 C192.2@7339.4,1497.62 v1@7339.4,1534.4
  other v1: 6400,1540
-15V: -15.1 C113.2 C119.1 C121.2 C124.2 C126.2 C129.2 C131.2 C133.2 C135.2 C137.2 J2.19 L5.2 U16.4 U17.4 U18.4 U19.4 U20.4 U21.4 U22.4 U23.4 | length 3042.2
  Top Layer w10: U23.4@1668,970 U23.4@1690,970 ; U22.4@2568,970 U22.4@2590,970 ; U21.4@3468,970 U21.4@3490,970 ; U16.4@4368,970 U16.4@4390,970 ; U18.4@5268,970 U18.4@5290,970
  Top Layer w30: C126.2@709.92,1060 709.92,945.08 v1(710,945) ; C126.2@709.96,1059.25 760.75,1059.25 790,1030 U17.4@790,970 ; v1(1610,945) 1609.22,945.78 C137.2@1609.22,1060 1660,1060 1690,1030 U23.4@1690,970 ; v1(2510,945) 2508.52,946.48 C135.2@2508.52,1060 2572.43,1060 2590,1042.43 U22.4@2590,970 ; v1(3410,955) 3407.81,957.19 C133.2@3407.81,1060 3472.43,1060 3490,1042.43 U21.4@3490,970 ; v1(4310,965) 4307.11,967.89 C121.2@4307.11,1060 4372.43,1060 4390,1042.43 U16.4@4390,970 ; v1(5205,965) 5206.41,966.41 C124.2@5206.41,1060 5272.43,1060 5290,1042.43 U18.4@5290,970 ; v1(6105,960) 6105.7,960.7 C129.2@6105.7,1060 6160,1060 6190,1030 U19.4@6190,970 ; v1(7080,970) 7080.53,970.53 7080.53,1059.29 7080.57,1059.25 7110.75,1059.25 7157.57,1012.43 7157.57,973 7160.57,970 U20.4@7161.91,970
  Top Layer w40: v1(360,2780) 390,2810 -15.1@610,2810 C119.1@720.08,2810 721.1,2811.03 C113.2@721.1,3035 721.1,3041.23 777.3,3097.42 L5.2@777.3,3260
A1: CON2.39 R24.2 R63.2 | length 5350.6
  Top Layer w6: R24.2@2895,4574.84 2895.79,4574.84 2925.63,4545 2975,4545 2990.26,4560.26 2990.26,4695.26 3210,4915 3930,4915 4210,5195 4210,5915 4305,6010 v1(4410,6010) 4450,6010 4495,5965 4495,4930 4740,4685 R63.2@4740,4595 ; CON2.39@4009.44,6744.16 4009.86,6744.58 4254.58,6744.58 v1(4255,6745)
  Bottom Layer w6: v1(4255,6745) 4340,6745 4465,6620 4465,6065 v1(4410,6010)
ADC_PD_RST_N: R47.1 R82.1 R108.2 R113.2 U3.6 U10.6 | length 2974.4
  Top Layer w6: U3.6@3185,4270 3185.1,4269.9 3226.77,4269.9 3252.91,4296.04 3252.91,4392.91 3280,4420 R47.1@3315.08,4420 3319.12,4424.04 3335.52,4424.04 3716.48,4805 3980,4805 4275,5100 R108.2@4315,5100 ; R108.2@4315,5099.76 R113.2@4315,5165 ; R108.2@4315.24,5100 v1(4380,5100) ; U10.6@5050,4280 5050.5,4280.5 5089.77,4280.5 5120.41,4311.14 5120.41,4385.41 5159.63,4424.63 5169.71,4424.63 R82.1@5180.08,4435 5180.08,4435.79 5155.87,4460 v1(5130,4460)
  Bottom Layer w6: v1(4380,5100) 4490,5100 v1(5130,4460)
ADIN1: 10.1 R264.1 R270.2 R281.2 U17.6 | length 1360.2
  Top Layer w10: R281.2@270,965 270.87,965 300.87,995 10.1@390,995 ; U17.6@570,920 465,920 10.1@390,995 ; v1(635,1455) 635,1352.78 390,1107.78 10.1@390,995 ; v1(635,1545) 635,1810.12 R264.1@635,1810.16 R270.2@735,1810.16
  Bottom Layer w10: v1(635,1455) v1(635,1545)
ADIN2: 16.1 R260.1 R267.2 R278.2 U23.6 | length 1372.7
  Top Layer w10: R278.2@1255,895 1255,970 16.1@1290,1005 ; U23.6@1470,920 1375,920 16.1@1290,1005 ; v1(1570,1445) 1570,1365 1290,1085 16.1@1290,1005 ; v1(1570,1550) 1570,1745 1599.96,1774.96 1599.96,1797.1 R260.1@1601.93,1799.07 1701.01,1799.07 R267.2@1705,1795.08
  Bottom Layer w10: v1(1570,1445) v1@1570,1555
ADIN3: 14.1 R261.1 R268.2 R279.2 U22.6 | length 1362.7
  Top Layer w10: R279.2@2155,900 2155,970 14.1@2195,1010 ; U22.6@2370,920 2285,920 14.1@2195,1010 ; v1(2465,1440) 2465,1375.3 2195,1105.3 14.1@2195,1010 ; v1(2470,1525) 2470,1737.27 2502.65,1769.92 2502.65,1804.14 2599.96,1804.14 R268.2@2603.49,1800.62
  Bottom Layer w10: v1(2465,1440) 2467.5,1442.5 2467.5,1522.5 v1(2470,1525)
ADIN4: 15.1 R262.1 R269.2 R280.2 U21.6 | length 1322.4
  Top Layer w10: R280.2@3050,939.84 3053.95,943.79 3053.95,963.95 15.1@3100,1010 ; U21.6@3270,920 3200,920 3110,1010 15.1@3100,1010 ; v1(3380,1430) 3380,1365.28 3100,1085.28 15.1@3100,1010 ; v1(3380,1535) 3380,1755 3396.39,1771.39 R262.1@3396.39,1806.48 ; R262.1@3395.6,1806.48 3498.59,1806.48 R269.2@3500,1805.08
  Bottom Layer w10: v1(3380,1430) v1(3380,1535)
ADIN5: 9.1 R252.1 R263.2 R275.2 U16.6 | length 1376.1
  Top Layer w10: R275.2@3960,929.84 3960,981.73 3995,1016.73 9.1@3995,1030 ; U16.6@4170,920 4105,920 9.1@3995,1030 ; v1(4320,1520) 4320,1400 4115,1195 4075,1195 3995,1115 9.1@3995,1030 ; v1(4320,1650) 4320,1750 4341.08,1771.08 4341.08,1803.31 R263.2@4441.87,1803.31
  Bottom Layer w10: v1(4320,1520) v1(4320,1650)
ADIN6: 11.1 R249.1 R257.2 R258.2 U18.6 | length 1463.7
  Top Layer w10: R257.2@4845,910 4845,965 11.1@4895,1015 ; U18.6@5070,920 4990,920 11.1@4895,1015 ; v1(5275,1425) 5275,1380 5158.39,1263.39 5058.39,1263.39 4895,1100 11.1@4895,1015 ; v1(5280,1615) 5295.63,1630.63 5295.63,1813.31 R258.2@5396.42,1813.31
  Bottom Layer w10: v1(5275,1425) 5277.5,1427.5 5277.5,1608.71 5280,1611.21 v1(5280,1615)
ADIN7: 12.1 R256.1 R265.2 R276.2 U19.6 | length 1483.5
  Top Layer w10: R276.2@5745,900 5745,960 12.1@5800,1015 ; U19.6@5970,920 5895,920 12.1@5800,1015 ; v1(6210,1425) 6210,1365 6080,1235 5946.77,1235 5800,1088.23 12.1@5800,1015 ; v1(6210,1535) 6210,1740 6230,1760 6230,1792.3 R256.1@6229.3,1793.01 6327.07,1793.01 R265.2@6330,1790.08
  Bottom Layer w10: v1(6210,1425) v1(6210,1535)
ADIN8: 13.1 R259.1 R266.2 R277.2 U20.6 | length 1462.6
  Top Layer w10: R277.2@6715,919.92 6715,962.24 13.1@6767.76,1015 ; U20.6@6941.91,920 6862.76,920 13.1@6767.76,1015 ; v1(7140,1415) 7140,1350 6996,1206 6861,1206 6767.76,1112.76 13.1@6767.76,1015 ; v1(7140,1550) 7140,1735 7164.22,1759.22 7164.22,1798.09 R259.1@7165.01,1798.09 R266.2@7270.01,1798.09
  Bottom Layer w10: v1(7140,1415) v1(7140,1550)
AIN1_N: C7.2 R6.2 R8.2 U3.32 | length 763.8
  Top Layer w6: R6.2@2520,3785 2582.86,3785 C7.2@2585.08,3782.78 2596.35,3771.5 2603.49,3771.5 2607,3767.99 2607,3751.89 2605.65,3750.54 2605.65,3725.91 2602.14,3722.39 2585.08,3722.39 R8.2@2576.42,3713.74 ; C7.2@2585.08,3783.56 2597.04,3795.52 2603.49,3795.52 2607,3799.04 2607,3810.92 2760.14,3964.06 2857.24,3964.06 3002.95,4109.77 3002.95,4140.05 U3.32@3001.1,4141.9
AIN1_P: C7.1 R13.2 U3.33 | length 698.6
  Top Layer w6: R13.2@2650.88,3713.74 2642.22,3722.39 2625.17,3722.39 2621.65,3725.91 2621.65,3743.91 2623,3745.26 2623,3767.99 2626.51,3771.5 2633.65,3771.5 C7.1@2644.92,3782.78 2644.92,3783.56 2632.96,3795.52 2626.51,3795.52 2623,3799.04 2623,3804.29 2766.77,3948.06 2863.87,3948.06 3018.95,4103.14 3018.95,4140.05 U3.33@3020.8,4141.9
AIN2_N: C16.2 R23.2 R25.2 U3.34 | length 645.1
  Top Layer w6: R23.2@2710,3780 C16.2@2775,3780 ; R25.2@2765,3713.74 2775,3723.74 2791.82,3723.74 2795.33,3727.25 2795.33,3749.7 2796.92,3751.29 2796.92,3765.21 2793.41,3768.73 2786.27,3768.73 C16.2@2775,3780 ; U3.34@3040.5,4141.9 3042.3,4140.1 3042.3,4091.64 2796.92,3846.26 2796.92,3794.79 2793.41,3791.27 2786.27,3791.27 C16.2@2775,3780
AIN2_P: C16.1 R29.2 U3.35 | length 580.1
  Top Layer w6: R29.2@2841.67,3713.74 2831.67,3723.74 2814.85,3723.74 2811.33,3727.25 2811.33,3743.08 2812.92,3744.66 2812.92,3765.21 2816.44,3768.73 2823.57,3768.73 C16.1@2834.84,3780 2823.57,3791.27 2816.44,3791.27 2812.92,3794.79 2812.92,3839.63 3058.3,4085.01 3058.3,4140.1 U3.35@3060.1,4141.9
AIN3_N: C26.2 R35.2 R39.2 U3.36 | length 581.8
  Top Layer w6: R35.2@2900,3780 C26.2@2965,3780 ; R39.2@2960,3713.74 2966.3,3720.04 2984.06,3720.04 2987.57,3723.56 2987.57,3741.7 2986.92,3742.35 2986.92,3765.21 2983.41,3768.73 2976.27,3768.73 C26.2@2965,3780 ; U3.36@3079.8,4141.9 3081.65,4140.05 3081.65,4006.94 2986.92,3912.21 2986.92,3794.79 2983.41,3791.27 2976.27,3791.27 C26.2@2965,3780
AIN3_P: C26.1 R43.2 U3.37 | length 516.8
  Top Layer w6: R43.2@3031.15,3713.74 3024.84,3720.04 3007.09,3720.04 3003.57,3723.56 3003.57,3748.32 3002.92,3748.98 3002.92,3765.21 3006.44,3768.73 3013.57,3768.73 C26.1@3024.84,3780 3013.57,3791.27 3006.44,3791.27 3002.92,3794.79 3002.92,3905.59 3097.65,4000.31 3097.65,4140.05 U3.37@3099.5,4141.9
AIN4_N: C38.2 R46.2 R48.2 U3.38 | length 565.5
  Top Layer w6: R46.2@3090,3780 C38.2@3154.84,3780 ; U3.38@3119.2,4141.9 3121.05,4140.05 3121.05,3980.8 3176.76,3925.1 3176.76,3794.79 3173.24,3791.27 3166.11,3791.27 C38.2@3154.84,3780 ; R48.2@3149.86,3713.74 3156.69,3720.57 3174.17,3720.57 3177.68,3724.09 3177.68,3741.82 3176.76,3742.75 3176.76,3765.21 3173.24,3768.73 3166.11,3768.73 C38.2@3154.84,3780
AIN4_P: C38.1 R52.2 U3.39 | length 500.7
  Top Layer w6: U3.39@3138.9,4141.9 3137.05,4140.05 3137.05,3987.43 3192.76,3931.72 3192.76,3794.79 3196.27,3791.27 3203.41,3791.27 C38.1@3214.68,3780 3203.41,3768.73 3196.27,3768.73 3192.76,3765.21 3192.76,3749.38 3193.68,3748.45 3193.68,3724.09 3197.2,3720.57 3214.68,3720.57 R52.2@3221.51,3713.74
AIN5_N: C45.2 R56.2 R57.2 U10.32 | length 779.4
  Top Layer w6: R56.2@4385,3755 4447.08,3755 C45.2@4449.86,3757.78 ; R57.2@4445,3689.92 4450.3,3695.22 4468.49,3695.22 4472,3698.73 4472,3718.39 4471.78,3718.61 4471.78,3742.99 4468.27,3746.5 4461.13,3746.5 C45.2@4449.86,3757.78 ; U10.32@4868.05,4151.9 4869.9,4150.05 4869.9,4119.77 4706.69,3956.56 4642.42,3956.56 4471.78,3785.92 4471.78,3774.04 4468.27,3770.52 4461.82,3770.52 4449.86,3758.56 C45.2@4449.86,3757.78
AIN5_P: C45.1 R60.2 U10.33 | length 713.3
  Top Layer w6: R60.2@4515,3689.92 4509.7,3695.22 4491.51,3695.22 4488,3698.73 4488,3725.02 4487.78,3725.23 4487.78,3742.99 4491.3,3746.5 4498.43,3746.5 C45.1@4509.7,3757.78 4509.7,3758.56 4497.74,3770.52 4491.3,3770.52 4487.78,3774.04 4487.78,3779.29 4649.05,3940.56 4713.32,3940.56 4885.9,4113.14 4885.9,4150.05 U10.33@4887.75,4151.9
AIN6_N: C49.2 R65.2 R67.2 U10.34 | length 676.1
  Top Layer w6: R65.2@4595,3755 4657.42,3755 C49.2@4659.65,3752.78 ; R67.2@4655,3684.84 4660.51,3690.35 4678.49,3690.35 4682,3693.87 4682,3713.35 4681.57,3713.78 4681.57,3737.99 4678.05,3741.5 4670.92,3741.5 C49.2@4659.65,3752.78 ; U10.34@4907.45,4151.9 4909.25,4150.1 4909.25,4074.18 4681.57,3846.5 4681.57,3767.56 4678.05,3764.05 4670.92,3764.05 C49.2@4659.65,3752.78
AIN6_P: C49.1 R69.2 U10.35 | length 610.5
  Top Layer w6: R69.2@4725,3684.84 4719.49,3690.35 4701.51,3690.35 4698,3693.87 4698,3719.98 4697.57,3720.41 4697.57,3737.99 4701.08,3741.5 4708.22,3741.5 C49.1@4719.49,3752.78 4708.22,3764.05 4701.08,3764.05 4697.57,3767.56 4697.57,3839.87 4925.25,4067.55 4925.25,4150.1 U10.35@4927.05,4151.9
AIN7_N: C60.2 R73.2 R74.2 U10.36 | length 611.6
  Top Layer w6: R73.2@4790,3755 4852.42,3755 C60.2@4854.65,3752.78 ; R74.2@4850,3684.92 4855.51,3690.43 4873.49,3690.43 4877,3693.95 4877,3713.39 4876.57,3713.82 4876.57,3737.99 4873.05,3741.5 4865.92,3741.5 C60.2@4854.65,3752.78 ; U10.36@4946.75,4151.9 4948.6,4150.05 4948.6,3986.98 4876.57,3914.95 4876.57,3767.56 4873.05,3764.05 4865.92,3764.05 C60.2@4854.65,3752.78
AIN7_P: C60.1 R77.2 U10.37 | length 546
  Top Layer w6: R77.2@4920,3684.92 4914.49,3690.43 4896.51,3690.43 4893,3693.95 4893,3720.02 4892.57,3720.45 4892.57,3737.99 4896.08,3741.5 4903.22,3741.5 C60.1@4914.49,3752.78 4903.22,3764.05 4896.08,3764.05 4892.57,3767.56 4892.57,3908.32 4964.6,3980.36 4964.6,4150.05 U10.37@4966.45,4151.9
AIN8_N: C71.2 R86.2 R91.2 U10.38 | length 613.6
  Top Layer w6: R86.2@4980,3755 C71.2@5045.08,3755 ; U10.38@4986.15,4151.9 4988,4150.05 4988,3988.39 5067,3909.39 5067,3770.48 5063.49,3766.96 5057.04,3766.96 C71.2@5045.08,3755 ; R91.2@5040,3684.92 5045.08,3690 5063.49,3690 5067,3693.51 5067,3740.21 5063.49,3743.73 5056.35,3743.73 C71.2@5045.08,3755
AIN8_P: C71.1 R95.2 U10.39 | length 548.5
  Top Layer w6: U10.39@5005.85,4151.9 5004,4150.05 5004,3995.02 5083,3916.02 5083,3770.48 5086.51,3766.96 5092.96,3766.96 C71.1@5104.92,3755 5093.65,3743.73 5086.51,3743.73 5083,3740.21 5083,3693.51 5086.51,3690 5104.92,3690 R95.2@5110,3684.92
AVDD: C8.2 C21.2 C23.2 C34.2 C39.1 C46.1 C51.1 C52.2 C66.2 C68.1 C80.1 C81.2 C199.2 C200.2 L2.2 R50.2 R87.2 T1.1 U3.4 U3.31 U3.40 U10.4 U10.31 U10.40 U43.3 U43.4 | length 2691.4
  Top Layer w10: U3.4@3185,4230 3198.85,4230 3198.95,4229.9 3228.7,4229.9 3266.91,4268.11 3266.91,4306.04 3315.08,4354.21 3364.96,4304.33 3364.96,4295.04 C34.2@3372.46,4287.54 ; v1@3280,4360 3310.08,4360 C39.1@3315.08,4355 ; C34.2@3374.92,4290 3375,4289.92 3479.92,4289.92 R50.2@3480,4290 ; U10.40@5025.55,4151.9 5025.55,4113.5 5089.06,4050 C51.1@5095,4050 ; U10.4@5055,4240 5055.5,4240.5 5098.7,4240.5 5134.41,4276.21 5134.41,4323.54 5180.08,4369.21 5229.96,4319.33 5229.96,4315.75 C66.2@5240.71,4305 ; C51.1@5095,4044.84 5170.16,4044.84 C52.2@5180,4035 ; v1(5150,4370) C68.1@5180.08,4370 ; C66.2@5239.92,4305 R87.2@5340,4305
  Top Layer w15: C8.2@2820,4104.92 v1@2820,4150 ; C8.2@2820,4105 2970,4105 2981.4,4116.4 U3.31@2981.4,4141.9 ; U3.40@3158.6,4141.9 3158.6,4096.4 3210,4045 C21.2@3255,4045 ; C21.2@3255,4044.84 C23.2@3334.84,4044.84 ; C23.2@3335,4037.7 v1(3335,4100) ; v1(4645,4105) 4714.92,4105 C46.1@4715,4104.92 ; C46.1@4715,4105 4820,4105 4848.35,4133.35 U10.31@4848.35,4151.9
  Top Layer w20: C199.2@3450,3764.84 v1@3450,3825 ; C199.2@3450.12,3764.88 C200.2@3515,3764.92 C200.2@3515,3764.92 ; C200.2@3515,3765 3516.16,3766.16 3620.45,3766.16 U43.4@3621.69,3767.4 3707.6,3767.4 U43.3@3710,3765 ; C52.2@5175,4035.4 v1(5175,4090)
  Top Layer w30: C81.2@2369.92,4430 2369.96,4429.96 T1.1@2370,4350 T1.1@2370,4350 v1(2370,4285) ; C81.2@2369.92,4430.71 2383.74,4444.53 C80.1@2383.74,4575 2383.74,4580.73 2410,4606.99 L2.2@2410,4722.5
  other v1: 3450,3830 2820,4145 3275,4360
B3: CON4.20 R66.2 | length 2214.5
  Top Layer w6: v1(4564,6545) 4565.13,6546.13 4698.87,6546.13 CON4.20@4700,6547.26 ; v1(4565,6020) 4564,6019 4564,4966 4870,4660 R66.2@4870,4595
  Bottom Layer w6: v1(4564,6545) 4564.5,6544.5 4564.5,6020.5 v1(4565,6020)
B4: CON4.18 R5.2 | length 2610.3
  Top Layer w6: v1(4100,7930) 4370,7930 4565,8125 R5.2@4565,8485.08 ; v1(4615,6525) 4616.33,6526.33 4698.67,6526.33 CON4.18@4700,6527.66
  Bottom Layer w6: v1(4100,7930) 4100,7745 4615,7230 v1(4615,6525)
C01: JP8.2 R179.2 R180.1 U38.15 | length 319.4
  Top Layer w10: R180.1@300,1400.08 R179.2@300,1335 JP8.2@390,1335 391.52,1335 486.52,1430 U38.15@515,1430
C2: CON2.35 R26.2 R64.2 | length 5230.7
  Top Layer w6: R26.2@2960,4574.84 2960,4720 3205,4965 3925,4965 4190,5230 4190,5940 4300,6050 v1@4415,6050 ; CON2.35@4009.44,6704.76 4009.56,6704.88 4219.88,6704.88 v1(4220,6705) ; v1(4415,6046) v1@4415,6050 ; R64.2@4805,4595 4805,4675 4525,4955 4525,5970 4445,6050 v1@4415,6050
  Bottom Layer w6: v1(4220,6705) 4320,6705 4435,6590 4435,6070 4428.56,6063.56 4428.56,6059.56 v1(4415,6046)
C02: JP16.2 R196.2 R197.1 U38.10 | length 310.8
  Top Layer w10: R196.2@295,1660 R197.1@295,1730.08 295.08,1730 JP16.2@390,1730 ; v1(460,1680) U38.10@515,1680
  Bottom Layer w10: JP16.2@390,1730 440,1680 v1(460,1680)
C3: CON4.30 LED1.2 | length 980.5
  Top Layer w6: CON4.30@4700,6645.76 4559.24,6645.76 4465,6740 4465,6955 4565,7055 LED1.2@4915,7055
C03: JP24.2 R213.2 R214.1 U38.2 | length 314.8
  Top Layer w10: U38.2@730.4,1430 756.18,1430 845,1341.18 JP24.2@845,1340 935.08,1340 R213.2@940,1344.92 R214.1@940,1410.08
C4: CON4.24 R68.2 | length 2241.5
  Top Layer w6: v1(4595,6035) 4595,4990 4935,4650 R68.2@4935,4590 ; v1(4595,6585) 4595.83,6585.83 4699.17,6585.83 CON4.24@4700,6586.66
  Bottom Layer w6: v1(4595,6035) v1(4595,6585)
C04: JP32.2 R230.2 R231.1 U38.7 | length 301.6
  Top Layer w10: U38.7@730.4,1680 790,1680 JP32.2@845,1735 930.08,1735 R231.1@940,1725.08 R230.2@940,1659.92
C5: CON4.26 R28.2 | length 3322
  Top Layer w6: R28.2@3025,4574.84 3025,4670 3245,4890 3955,4890 4235,5170 4235,5905 4300,5970 v1(4460,5970) ; v1(4545,6600) 4548.79,6600 4555.15,6606.36 CON4.26@4700,6606.36
  Bottom Layer w6: v1(4460,5970) 4545,6055 v1(4545,6600)
C11: JP6.2 R173.2 R174.1 U36.15 | length 322.3
  Top Layer w10: R174.1@1256.23,1388.63 R173.2@1256.23,1323.55 1261.15,1318.63 JP6.2@1351.23,1318.63 1351.23,1328.22 1442.07,1419.07 U36.15@1464.23,1419.07
C12: JP13.2 R189.2 R190.1 U36.10 | length 288.7
  Top Layer w10: R189.2@1261.23,1643.55 R190.1@1261.23,1708.71 1266.15,1713.63 JP13.2@1351.23,1713.63 ; v1(1415,1670) 1415.47,1669.53 1463.76,1669.53 U36.10@1464.23,1669.07
  Bottom Layer w10: JP13.2@1351.23,1713.63 1357.58,1713.63 1398.53,1672.68 1412.32,1672.68 v1(1415,1670)
C13: JP21.2 R207.2 R208.1 U36.2 | length 318.5
  Top Layer w10: U36.2@1679.63,1419.07 1706.19,1419.07 1801.23,1324.03 JP21.2@1801.23,1323.63 1886.23,1323.63 R207.2@1891.23,1328.63 R208.1@1891.23,1393.71
C14: JP29.2 R223.2 R224.1 U36.7 | length 295.4
  Top Layer w10: U36.7@1679.63,1669.07 1756.66,1669.07 JP29.2@1801.23,1713.63 1891.07,1713.63 R224.1@1891.23,1713.79 R223.2@1891.23,1648.55
C19: CON3.30 U7.1 | length 3492.6
  Top Layer w6: v1(3800,5750) 3800.15,5749.85 3859.69,5749.85 CON3.30@3859.84,5749.7 ; v1(5678.85,5833.85) 6305,6460 6305,6900 6335,6930 U7.1@6395,6930
  Bottom Layer w6: v1(3800,5750) 3910,5640 5485,5640 v1(5678.85,5833.85)
C21: JP5.2 R175.2 R176.1 U35.15 | length 313.7
  Top Layer w10: R176.1@2154.95,1393.53 R175.2@2154.95,1328.45 2164.87,1318.53 JP5.2@2244.95,1318.53 2244.95,1323.39 2335.09,1413.53 U35.15@2357.25,1413.53
C22: JP14.2 R191.2 R192.1 U35.10 | length 290.1
  Top Layer w10: R191.2@2154.95,1633.53 R192.1@2154.95,1698.61 2164.87,1708.53 JP14.2@2244.95,1708.53 ; v1(2301.47,1663.53) U35.10@2357.25,1663.53
  Bottom Layer w10: JP14.2@2244.95,1708.53 2252.68,1708.53 2297.68,1663.53 v1(2301.47,1663.53)
C23: JP22.2 R209.2 R210.1 U35.2 | length 317.4
  Top Layer w10: U35.2@2572.65,1413.53 2597.27,1413.53 2689.95,1320.85 JP22.2@2689.95,1318.53 2770.03,1318.53 R209.2@2779.95,1328.45 R210.1@2779.95,1393.68
C24: JP30.2 R225.2 R226.1 U35.7 | length 295.2
  Top Layer w10: U35.7@2572.65,1663.53 2644.95,1663.53 JP30.2@2689.95,1708.53 2770.11,1708.53 R226.1@2779.95,1698.68 R225.2@2779.95,1633.53
C31: JP7.2 R177.2 R178.1 U37.15 | length 313.8
  Top Layer w10: R178.1@3072.9,1393.25 R177.2@3072.9,1328.02 3073.69,1328.02 3088.53,1313.17 JP7.2@3162.9,1313.17 3162.9,1323.03 3248.04,1408.17 U37.15@3270.2,1408.17
C32: JP15.2 R193.2 R194.1 U37.10 | length 285.3
  Top Layer w10: R193.2@3072.9,1628.02 R194.1@3072.9,1693.25 3082.82,1703.17 JP15.2@3162.9,1703.17 ; v1(3220,1660) 3220.91,1659.09 3269.29,1659.09 U37.10@3270.2,1658.17
  Bottom Layer w10: JP15.2@3162.9,1703.17 3165.86,1703.17 3198.96,1670.08 3206.14,1670.08 3216.21,1660 v1(3220,1660)
C33: JP23.2 R211.2 R212.1 U37.2 | length 319.5
  Top Layer w10: U37.2@3485.6,1408.17 3510.23,1408.17 3602.9,1315.5 JP23.2@3602.9,1313.17 3677.27,1313.17 3692.11,1328.02 R211.2@3692.9,1328.02 R212.1@3692.9,1393.33
C34: JP31.2 R227.2 R228.1 U37.7 | length 296.1
  Top Layer w10: U37.7@3485.6,1658.17 3557.9,1658.17 JP31.2@3602.9,1703.17 3692.82,1703.17 R228.1@3692.9,1703.25 R227.2@3692.9,1633.09
C41: JP2.2 R167.2 R168.1 U40.15 | length 310.2
  Top Layer w10: R168.1@4014.76,1402.85 R167.2@4014.76,1337.77 4026.72,1325.81 4101.8,1325.81 JP2.2@4104.76,1322.85 4104.76,1326.62 4190.99,1412.85 U40.15@4214.18,1412.85